# Altium PCB 9268 RR Sensor Board1.PcbDoc
Units mm, origin at the board's own origin, x right, y up, seen from the top; angles counter-clockwise.
Board outline 40.34 x 63.83 mm, 2 copper layers (Top Layer, Bottom Layer), stack 1.58 mm thick; 6 components, 5 nets, 13 pads, 0 vias.
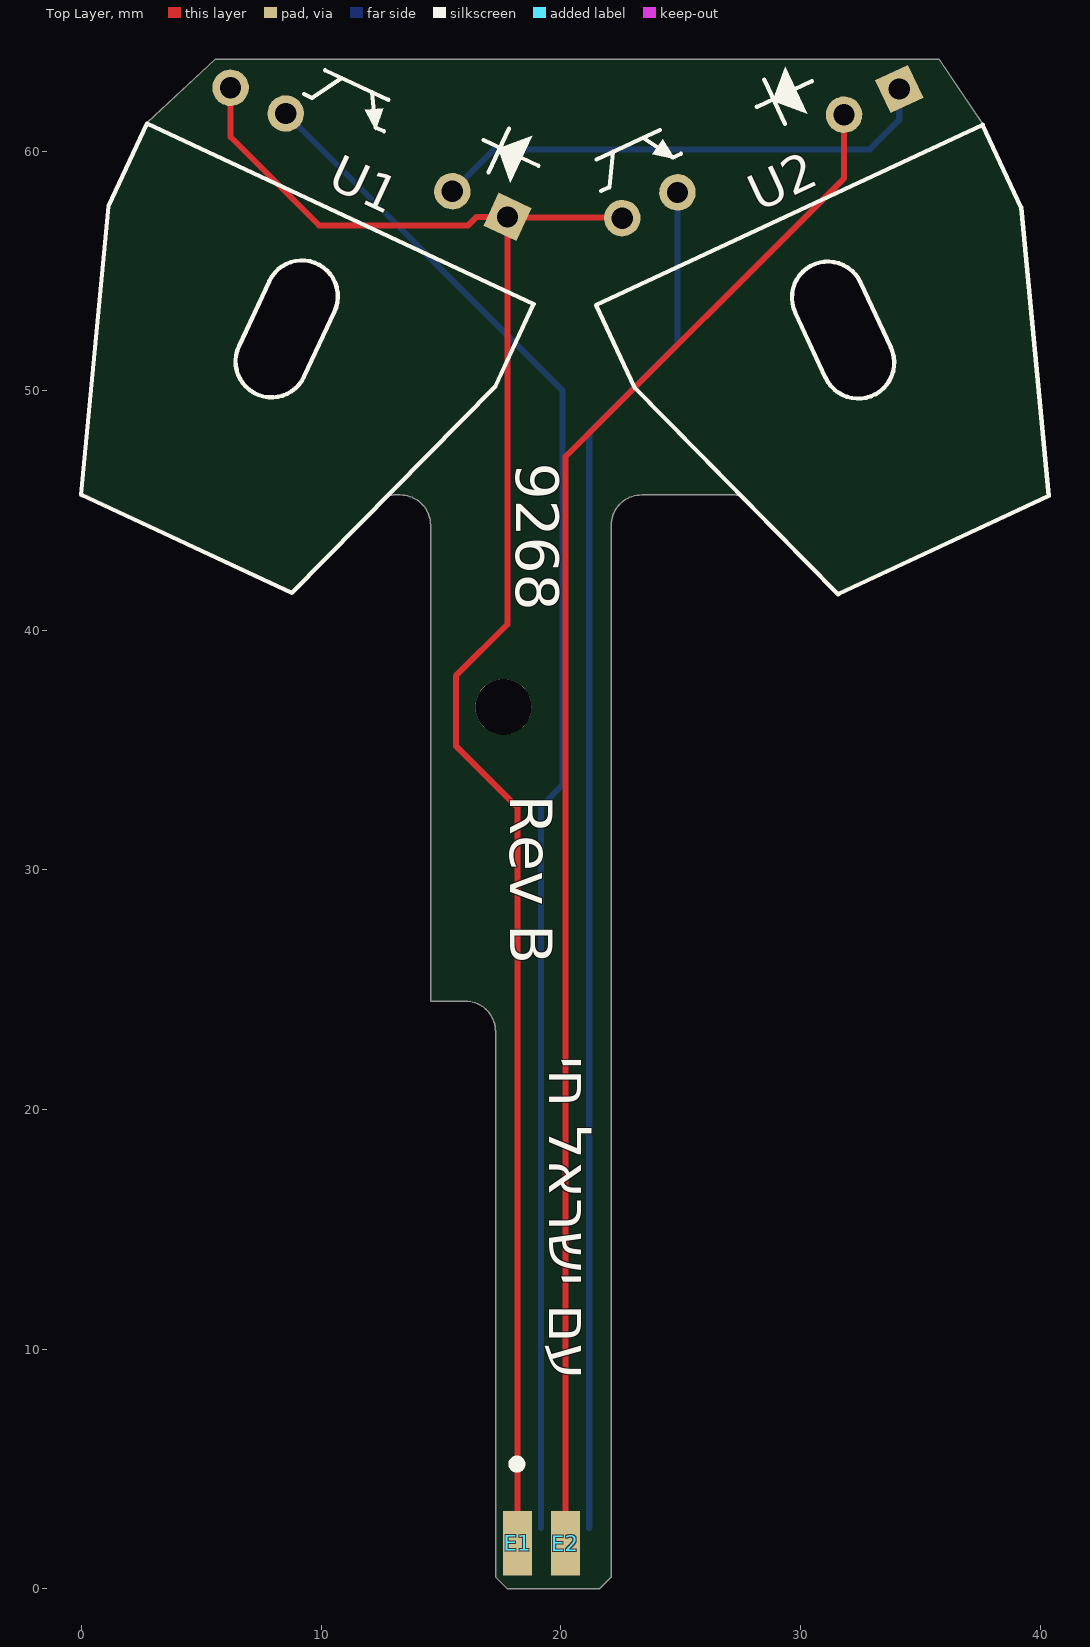
[diagram p0: Top Layer view]
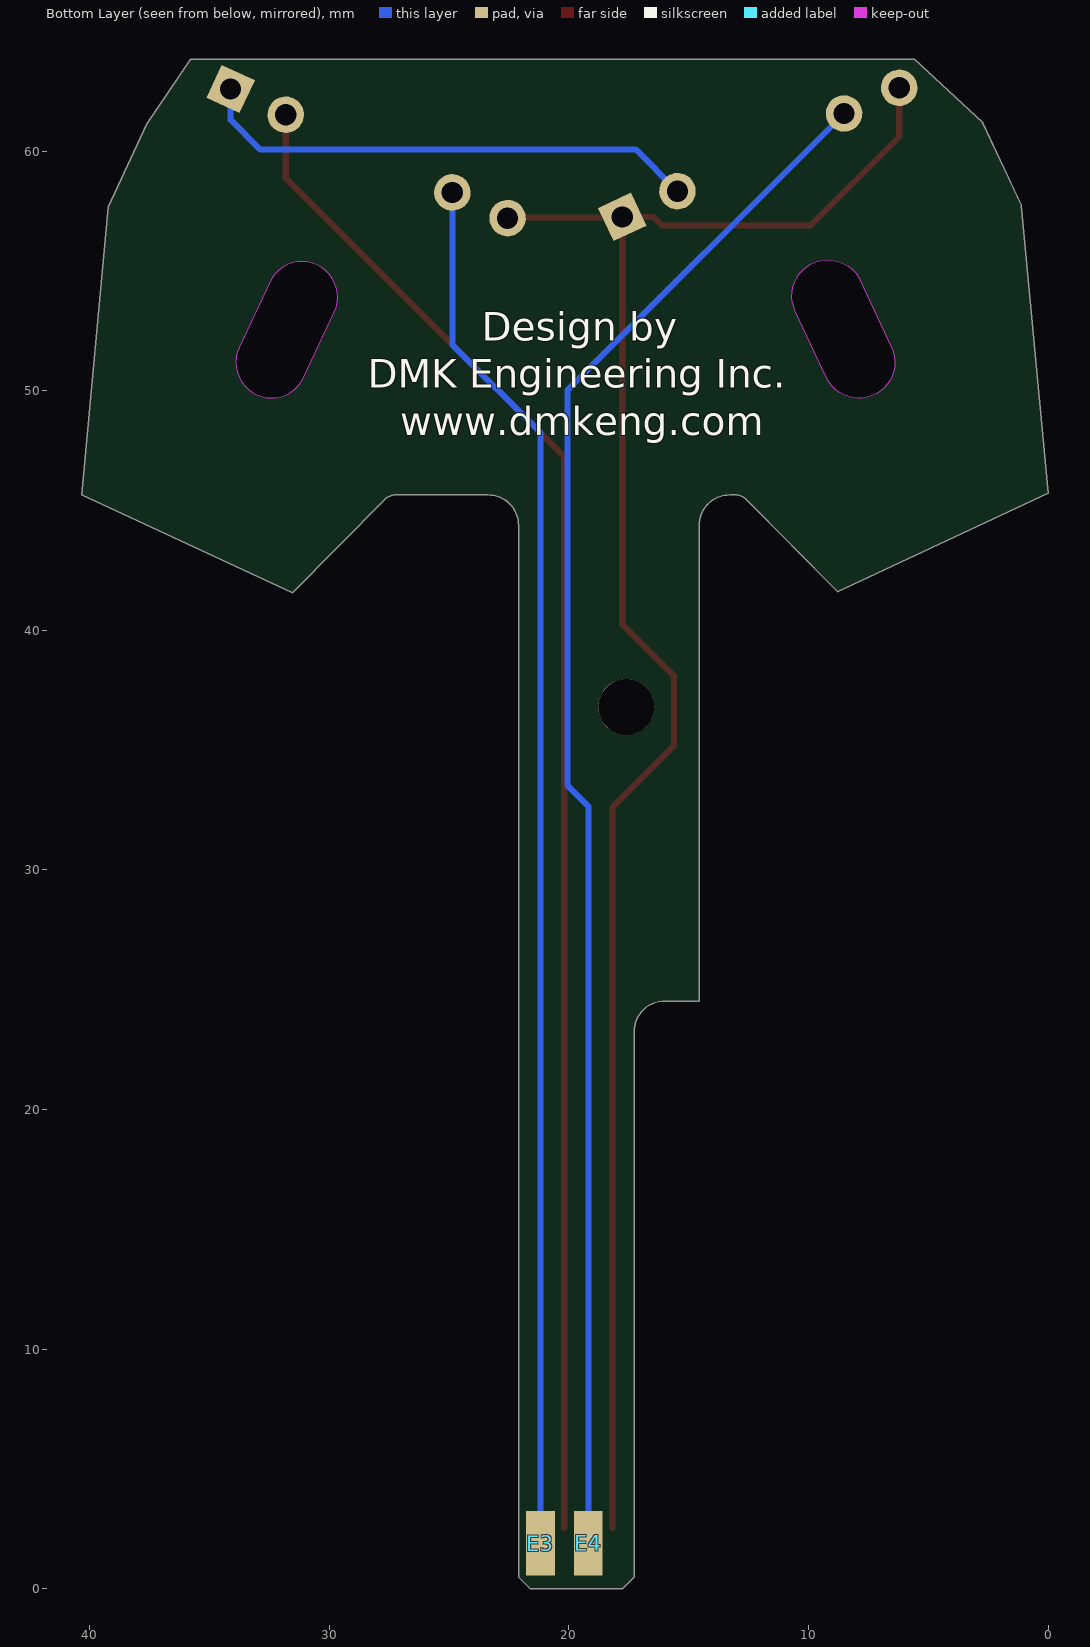
[diagram p1: Bottom Layer view, seen from below]

## Layer stack, top to bottom
Top Solder: solder mask 0.0102, Solder Resist, Dk 3.5
Top Layer: signal copper 0.0356
Dielectric 1: dielectric 1.5088, FR-4, Dk 4.8
Bottom Layer: signal copper 0.0356
Bottom Solder: solder mask 0.0102, Solder Resist, Dk 3.5

## Board outline
14.564,24.528 14.564,44.38 ccw(c13.294,44.38) 13.294,45.65 13.051,45.65 ccw(c13.051,45.015) 12.599,45.462 8.794,41.615 0,45.716 1.115,57.723 2.725,61.176 5.588,63.835 35.782,63.835 37.611,61.12 39.221,57.667 40.336,45.66 31.542,41.559 27.681,45.462 ccw(c27.23,45.015) 27.23,45.65 23.371,45.65 ccw(c23.371,44.38) 22.101,44.38 22.101,0.501 21.6,0 17.775,0 17.275,0.5 17.275,23.258 ccw(c16.005,23.258) 16.005,24.528
cut-out: 31.059,50.554 29.793,53.271 cw(c31.141,53.899) 32.489,54.528 33.756,51.812 cw(c32.407,51.183)
cut-out: 6.543,51.817 ccw(c7.902,51.183) 9.261,50.549 10.554,53.322 ccw(c9.195,53.956) 7.836,54.589

## Design rules (kind name [scope] priority, off if disabled: settings)
Clearance [All] p1: gap=0.203 ignorepadtopadclearanceinfootprint=FALSE
PolygonConnect [All] p1: connectstyle=Relief reliefconductorwidth=0.254 reliefentries=4 polygonreliefangle="90 Angle" airgapwidth=0.254
RoutingVias [All] p1: holewidth=0.711 width=1.27 viastyle="Through Hole" minholewidth=0.711 minwidth=1.27 maxholewidth=0.711 maxwidth=1.27
SolderMaskExpansion [All] p1: expansion=0.102 istentingtop=FALSE
Width [All] p1: maxlimit=0.254 minlimit=0.254 preferedwidth=0.254
30 further rules are at their usual default settings.

## Components (designator, comment, footprint, x,y, rotation, side; value= is the part's Value field where it differs from the comment)
E1 "PAD" "PAD 1.0 x 2.7 mm"#1 18.225,1.85 r0 top
E2 "PAD" "PAD 1.0 x 2.7 mm"#2 20.175,1.9 r0 top
E3 "PAD" "PAD 1.0 x 2.7 mm"#3 21.19,1.9 r180 bottom
E4 "PAD" "PAD 1.0 x 2.7 mm"#3 19.19,1.9 r180 bottom
U1 "BPR-301" BPR-301 8.56,52.578 r335 top
U2 "BPR-301" BPR-301 31.775,52.527 r25 top

## Footprints (in the part's own frame and the unit in brackets; to place one, negate y for a bottom-side part, rotate by r counter-clockwise, add the part's x,y. Pads: shape width x height; smd on the part's side, far side on the other; paste and mask are expansions set on the pad)
BPR-301 [mil]
  rect 60x60 hole 35: 1(251,320)
  round 60 hole 35: 2(151,320) 3(-151,320) 4(-251,320)
  silkscreen extent -350,-390 350,209, body extent -350,-537 352,330, height 200
"PAD 1.0 x 2.7 mm"#1 [mm]
  rect 1.2x2.7 smd paste-0.6: 1(-0.035,0.05)
"PAD 1.0 x 2.7 mm"#2 [mm]
  rect 1.2x2.7 smd paste-0.6: 1(0.015,0)
"PAD 1.0 x 2.7 mm"#3 [mm]
  rect 1.2x2.7 smd paste-0.6: 1(0,0)

## Part data
E1 E2 E3 E4: library part "TEST POINT", "Part of PCB"
U1 U2: "Sensor Opt Reflective Module", Case/Package=Module, Manufacturer="American Bright", Operating Supply Current=50mA, Supplier Part Number 1=BPR-301-ND, ComponentLink1Description=http://www.americanbrightled.com/pdffiles/infrared/BPR-301.pdf?src-supplier=Digikey, ComponentLink1URL=http://www.americanbrightled.com/pdffiles/infrared/BPR-301.pdf?src-supplier=Digikey, Manufacturer Part Number=BPR-301, Mounting Technology="Through Hole", Output Configuration="NPN - Open Collector", Packaging=Bulk, Pricing 1="1=1.8, 10=1.391, 100=1.0302, 1000=0.7984, 5000=0.7469, 10000=0.69539 (USD)", RoHS=Yes, RoHS Compliant=Yes, Series=-, Stock 1=12121, Supplier 1=Digikey

## Free pads (board coordinates)
  round 2.337 hole 2.337 unplated: 99(17.602,36.805)

## Nets (pads, with @x,y where several pads share a name; then routed paths per layer and width w, separated by ;. In a path a pad name is that pad's centre, name@x,y a point inside that pad or via, vN(x,y) a via of type N, cw(c..) or ccw(c..) an arc to the next point about the centre after c; other vN are vias at no path point)
NetE1_1: E1.1 U1.1 U1.4 U2.4 | length 76.8
  Top Layer w0.254: U1.4 6.217,60.585 9.906,56.896 16.129,56.896 16.483,57.25 U1.1 ; E1.1@18.186,2.54 18.186,32.614 15.621,35.179 15.621,38.1 17.773,40.252 U1.1 ; U2.4 22.537,57.225 17.798,57.225 U1.1
NetE2_1: E2.1 U2.2 | length 63.8
  Top Layer w0.254: E2.1@20.193,2.54 20.193,47.244 31.816,58.867 U2.2
NetE3_1: E3.1 U2.3 | length 57.3
  Bottom Layer w0.254: E3.1@21.184,2.54 21.184,48.235 24.864,51.915 U2.3
NetE4_1: E4.1 U1.3 | length 64.2
  Bottom Layer w0.254: U1.3 20.066,50.018 20.066,33.528 19.177,32.639 E4.1@19.177,2.54
NetU1_2: U1.2 U2.1 | length 21.2
  Bottom Layer w0.254: U1.2 17.218,60.071 32.893,60.071 34.118,61.296 U2.1

## Silkscreen, mask and mechanical layers (free items; w line width, h text height)
Top Overlay:
  circle w0.356: c18.161,5.207 r0.178
  region: 24.766,59.66 23.819,59.858 24.256,60.482 24.766,59.66 23.819,59.858
  region: 12.279,60.871 11.822,61.724 12.581,61.79 12.279,60.871 11.822,61.724
  region: 28.866,62.165 29.358,63.515 30.27,61.558 28.92,62.05
  region: 17.459,60.137 18.809,60.628 17.896,58.672 17.405,60.022
  lines w0.178: 9.276,62.381 9.622,62.22 10.849,63.049 ; 10.158,63.371 12.806,62.136 ; 12.115,62.459 12.269,60.985 12.614,60.824 ; 16.768,60.459 19.07,59.386 ; 16.976,59.101 17.834,60.943 ; 21.488,59.642 24.135,60.877 ; 21.679,58.33 22.025,58.491 22.179,59.964 ; 23.445,60.555 24.672,59.726 25.017,59.887 ; 28.176,61.843 30.478,62.916 ; 28.491,62.971 29.35,61.129
  text "9268" at 17.559,46.99 h3.05 r270
  text "Rev B" at 17.302,33.147 h3.05 r270
  text "יח לארשי םע" at 18.926,22.225 h3.05 r270
Bottom Overlay:
  text "Design by" at 23.645,51.689 h2.03
  text "DMK Engineering Inc." at 28.385,49.72 h2.03
  text "www.dmkeng.com" at 27.045,47.752 h2.03
Board:
  lines w0.254: 37.486,61.062 37.974,60.34 ; 0,45.716 8.794,41.615 12.599,45.462 cw(c13.051,45.015) 13.051,45.65 13.294,45.65 cw(c13.294,44.38) 14.564,44.38 14.564,24.528 16.005,24.528 cw(c16.005,23.258) 17.275,23.258 17.275,0.5 17.775,0 21.6,0 22.101,0.501 22.101,44.38 cw(c23.371,44.38) 23.371,45.65 27.23,45.65 cw(c27.23,45.015) 27.681,45.462 31.542,41.559 40.336,45.66 39.221,57.667 37.611,61.12 35.782,63.835 5.588,63.835 2.725,61.176 1.115,57.723 0,45.716 ; 6.543,51.817 ccw(c7.902,51.183) 9.261,50.549 10.554,53.322 ccw(c9.195,53.956) 7.836,54.589 6.543,51.817 ; 29.793,53.271 cw(c31.141,53.899) 32.489,54.528 33.756,51.812 cw(c32.407,51.183) 31.059,50.554 29.793,53.271